# Altium PCB BLDC-Board.PcbDoc (part 4 of 7)
Units mm, origin at the board's own origin, x right, y up, seen from the top; angles counter-clockwise.
Board outline 150 x 117 mm, 4 copper layers (Top Layer, Layer 1, Layer 2, Bottom Layer), stack 1.566 mm thick; 307 components, 221 nets, 983 pads, 534 vias.
Unrouted connection lines stored in the file: 337.
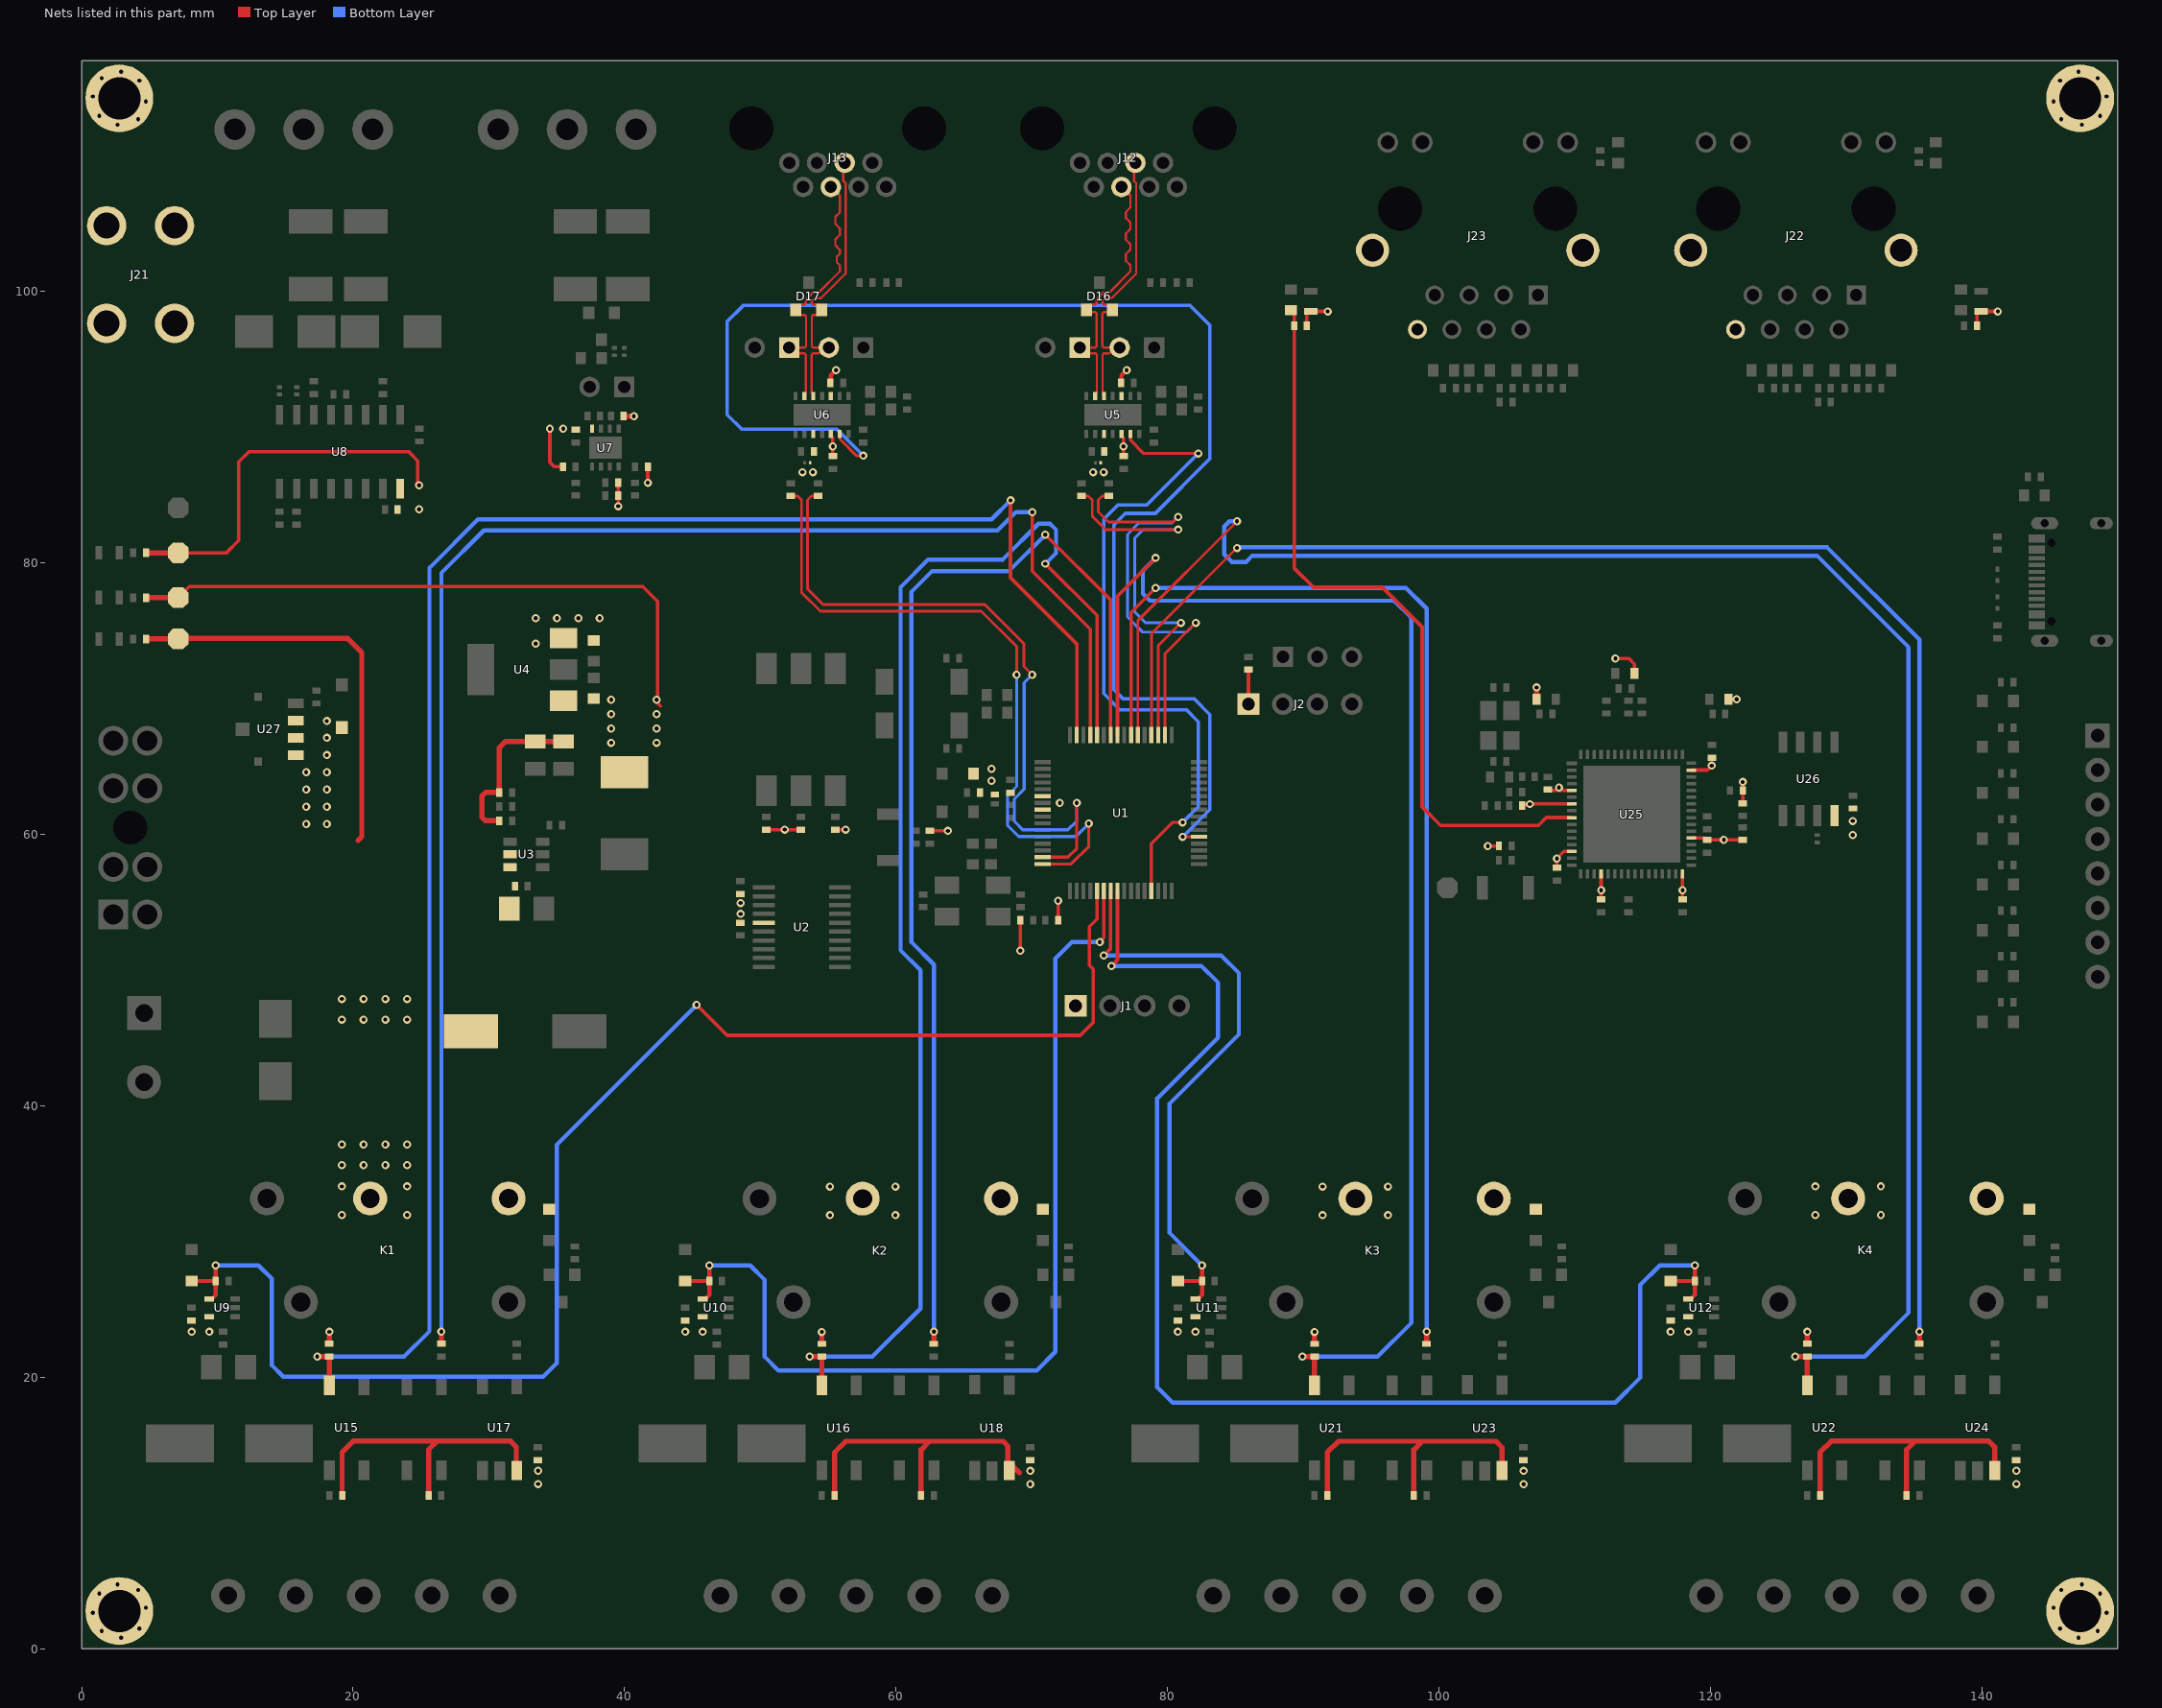
[diagram p4: the nets of this part, all layers, seen from the top]

## Part data (continued)
R25: library part RT0402BRD0730K1L, "RES SMD 30.1KOHM 0.1% 1/16W 0402", LCSC Part Number=C852714, Manufacturer=Yageo, Supplier Part Number=1991324P, Category="Chip SMD Resistors", ComponentLink1Description=https://datasheet.ciiva.com/12722/pyu-rt-1-to-0-05-rohs-l-4-12722119.pdf?src-supplier=Mouser, ComponentLink1URL=https://datasheet.ciiva.com/12722/pyu-rt-1-to-0-05-rohs-l-4-12722119.pdf?src-supplier=Mouser, ComponentLink2Description=https://datasheet.ciiva.com/2582/pyu-rt-1-to-0-05-rohs-l-5-2582303.pdf?src-supplier=Digi-Key, ComponentLink2URL=https://datasheet.ciiva.com/2582/pyu-rt-1-to-0-05-rohs-l-5-2582303.pdf?src-supplier=Digi-Key, Item Type=Resistor, Manufacturer Part Number=RT0402BRD0730K1L, Pricing="100=0.138, 250=0.115, 500=0.092, 1000=0.076 (GBP)", RoHS=Yes, Stock=7420, Supplier=Rs
R26: library part RC0402FR-073K9L, "RES 3.9K OHM 1% 1/16W 0402", Case Code (Imperial)=0402, Case Code (Metric)=1005, LCSC Part Number=C131467, Manufacturer=Yageo, Max Operating Temperature=155°C, Max Power Dissipation=63mW, Min Operating Temperature=-55°C, Power Rating=62.5mW, Resistance Tolerance=1%, Resistor Type="Thick Film", Supplier Part Number=9808155, Temperature Coefficient=100ppm/°C, Voltage Rating=50V, Case/Package=0402, Category="Chip SMD Resistors", ComponentLink1Description=https://datasheet.ciiva.com/12666/pyu-rc0402-51-rohs-l-6-r-12666997.pdf?src-supplier=Mouser, ComponentLink1URL=https://datasheet.ciiva.com/12666/pyu-rc0402-51-rohs-l-6-r-12666997.pdf?src-supplier=Mouser, ComponentLink2Description=https://datasheet.ciiva.com/7849/1018594-7849989.pdf?src-supplier=Element14, ComponentLink2URL=https://datasheet.ciiva.com/7849/1018594-7849989.pdf?src-supplier=Element14, ComponentLink3Description=https://datasheet.ciiva.com/7849/1018594-7849990.pdf?src-supplier=Element14, ComponentLink3URL=https://datasheet.ciiva.com/7849/1018594-7849990.pdf?src-supplier=Element14, ComponentLink4Description=https://datasheet.ciiva.com/15189/getdatasheetpartid-469246-15189453.pdf?src-supplier=Verical, ComponentLink4URL=https://datasheet.ciiva.com/15189/getdatasheetpartid-469246-15189453.pdf?src-supplier=Verical, Construction=Rectangular, Depth=0.5mm, Features="Moisture Resistant", Item Type=Resistor, Lead Free="Lead Free", Length=1mm, Manufacturer Part Number=RC0402FR-073K9L, Military Standard=Not, Number of Terminations=2, Packaging="Tape and Reel", Pricing="10000=0.0011, 100000=0.0011, 300000=0.001, 750000=0.001, 2000000=0.0009 (USD)", Reach SVHC Compliant=Unknown, RoHS=Yes, RoHS Compliant=Yes, Series=RC, Stock=6910000, Supplier="Future Electronics", Termination=SMD/SMT, Tolerance=1%, Voltage Rating (AC)=50V
R27 R82 R83 R92 R93: library part RC0402FR-07470RL, "RES 470 OHM 1% 1/16W 0402", Case Code (Imperial)=0402, Case Code (Metric)=1005, LCSC Part Number=C114877, Manufacturer=Yageo, Max Operating Temperature=155°C, Max Power Dissipation=63mW, Min Operating Temperature=-55°C, Package Quantity=1, Power Rating=62.5mW, Resistance Tolerance=1%, Resistor Type="Thick Film", Temperature Coefficient=100ppm/°C, Voltage Rating=50V, Case/Package=0402, ComponentLink1Description=https://datasheet.ciiva.com/46412/1018594-46412838.pdf?src-supplier=Element14, ComponentLink1URL=https://datasheet.ciiva.com/46412/1018594-46412838.pdf?src-supplier=Element14, ComponentLink2Description=https://datasheet.ciiva.com/2453/pyu-r-int-thick-7-2453377.pdf?src-supplier=Digikey, ComponentLink2URL=https://datasheet.ciiva.com/2453/pyu-r-int-thick-7-2453377.pdf?src-supplier=Digikey, ComponentLink3Description=https://datasheet.ciiva.com/2453/pyu-r-int-thick-7-2453378.pdf?src-supplier=Digikey, ComponentLink3URL=https://datasheet.ciiva.com/2453/pyu-r-int-thick-7-2453378.pdf?src-supplier=Digikey, ComponentLink4Description=https://datasheet.ciiva.com/2453/pyu-r-int-thick-7-2453376.pdf?src-supplier=Digikey, ComponentLink4URL=https://datasheet.ciiva.com/2453/pyu-r-int-thick-7-2453376.pdf?src-supplier=Digikey, ComponentLink5Description=https://datasheet.ciiva.com/7850/1018594-7850015.pdf?src-supplier=Element14, ComponentLink5URL=https://datasheet.ciiva.com/7850/1018594-7850015.pdf?src-supplier=Element14, ComponentLink6Description=https://datasheet.ciiva.com/7850/1018594-7850014.pdf?src-supplier=Element14, ComponentLink6URL=https://datasheet.ciiva.com/7850/1018594-7850014.pdf?src-supplier=Element14, ComponentLink7Description=https://datasheet.ciiva.com/15189/getdatasheetpartid-330246-15189463.pdf?src-supplier=Verical, ComponentLink7URL=https://datasheet.ciiva.com/15189/getdatasheetpartid-330246-15189463.pdf?src-supplier=Verical, Construction=Rectangular, Depth=0.5mm, Features="Moisture Resistant", Height=0.016inch, Item Type=Resistor, Lead Free="Lead Free", Length=1mm, Manufacturer Part Number=RC0402FR-07470RL, Military Standard=Not, Number of Terminations=2, Packaging="Tape and Reel", Pricing="10000=0.00085 (USD)", Reach SVHC Compliant=No, RoHS=Yes, RoHS Compliant=Yes, Series=RC, Stock=10000, Supplier=Avnet, Supplier Part Number=RC0402FR-07470RL, Termination=SMD/SMT, Tolerance=1%, Voltage Rating (AC)=50V, Width=0.02inch, Working Voltage=50V
R28: library part RC0402FR-07200RL, "RES 200 OHM 1% 1/16W 0402", Case Code (Imperial)=0402, Case Code (Metric)=1005, LCSC Part Number=C114764, Manufacturer=Yageo, Max Operating Temperature=155°C, Max Power Dissipation=63mW, Min Operating Temperature=-55°C, Package Quantity=1, Resistance Tolerance=1%, Resistor Type="Thick Film", Supplier Part Number 1=311-200LRCT-ND, Temperature Coefficient=100ppm/°C, Voltage Rating=50V, Case/Package=0402, Category="Chip SMD Resistors", ComponentLink1Description=https://datasheet.ciiva.com/2553/pyu-r-int-thick-7-2553232.pdf?src-supplier=Digi-Key, ComponentLink1URL=https://datasheet.ciiva.com/2553/pyu-r-int-thick-7-2553232.pdf?src-supplier=Digi-Key, ComponentLink2Description=https://datasheet.ciiva.com/7983/1018594-7983509.pdf?src-supplier=Element14, ComponentLink2URL=https://datasheet.ciiva.com/7983/1018594-7983509.pdf?src-supplier=Element14, ComponentLink3Description=https://datasheet.ciiva.com/16804/pyu-rc0402-51-rohs-l-6-r-16804406.pdf?src-supplier=Future+Electronics, ComponentLink3URL=https://datasheet.ciiva.com/16804/pyu-rc0402-51-rohs-l-6-r-16804406.pdf?src-supplier=Future+Electronics, ComponentLink4Description=https://datasheet.ciiva.com/15189/getdatasheetpartid-331152-15189383.pdf?src-supplier=Verical, ComponentLink4URL=https://datasheet.ciiva.com/15189/getdatasheetpartid-331152-15189383.pdf?src-supplier=Verical, ComponentLink5Description=https://datasheet.ciiva.com/7849/1018594-7849898.pdf?src-supplier=Element14, ComponentLink5URL=https://datasheet.ciiva.com/7849/1018594-7849898.pdf?src-supplier=Element14, ComponentLink6Description=https://datasheet.ciiva.com/5562/pyu-rc0402-51-rohs-l-6-r-8721-5562539.pdf?src-supplier=Mouser, ComponentLink6URL=https://datasheet.ciiva.com/5562/pyu-rc0402-51-rohs-l-6-r-8721-5562539.pdf?src-supplier=Mouser, ComponentLink7Description=https://datasheet.ciiva.com/7849/1018594-7849899.pdf?src-supplier=Element14, ComponentLink7URL=https://datasheet.ciiva.com/7849/1018594-7849899.pdf?src-supplier=Element14, ComponentLink8Description=https://datasheet.ciiva.com/2553/pyu-r-int-thick-7-2553230.pdf?src-supplier=Digi-Key, ComponentLink8URL=https://datasheet.ciiva.com/2553/pyu-r-int-thick-7-2553230.pdf?src-supplier=Digi-Key, ComponentLink9Description=https://datasheet.ciiva.com/2553/pyu-r-int-thick-7-2553231.pdf?src-supplier=Digi-Key, ComponentLink9URL=https://datasheet.ciiva.com/2553/pyu-r-int-thick-7-2553231.pdf?src-supplier=Digi-Key, Construction=Rectangular, Depth=0.5mm, Features="Moisture Resistant", Height=0.016inch, Lead Free="Lead Free", Length=1mm, Manufacturer Part Number=RC0402FR-07200RL, Military Standard=Not, Number of Terminations=2, Packaging="Tape and Reel", Power Rating=63mW, Pricing 1="1=0.10000, 10=0.01600, 100=0.00660, 1000=0.00299, 2500=0.00259, 5000=0.00214 (USD)", REACH SVHC="No SVHC", Resistance=200R, RoHS=Yes, RoHS Compliant=Yes, Series=RC, Size Code=0402, Stock 1=19778, Supplier 1=Digi-Key, Termination=SMD/SMT, Tolerance=1%, Voltage Rating (DC)=50V, Width=0.02inch
R29 R30 R122: library part RC0402FR-07100KL, "RES 100K OHM 1% 1/16W 0402", Case Code (Imperial)=0402, Case Code (Metric)=1005, LCSC Part Number=C60491, Manufacturer=Yageo, Max Operating Temperature=155°C, Max Power Dissipation=63mW, Min Operating Temperature=-55°C, Package Quantity=1, Resistance=100kR, Resistance Tolerance=1%, Resistor Type="Thick Film", Supplier Part Number 1=603-RC0402FR-07100KL, Temperature Coefficient=100ppm/°C, Voltage Rating=50V, Case/Package=0402, Category="Chip SMD Resistors", ComponentLink1Description=https://datasheet.ciiva.com/11819/0900766b80c66297-11819452.pdf?src-supplier=RSComponents, ComponentLink1URL=https://datasheet.ciiva.com/11819/0900766b80c66297-11819452.pdf?src-supplier=RSComponents, ComponentLink2Description=https://datasheet.ciiva.com/22747/1018594-22747509.pdf?src-supplier=Element14, ComponentLink2URL=https://datasheet.ciiva.com/22747/1018594-22747509.pdf?src-supplier=Element14, ComponentLink3Description=https://datasheet.ciiva.com/2453/pyu-r-int-thick-7-2453362.pdf?src-supplier=Digi-Key, ComponentLink3URL=https://datasheet.ciiva.com/2453/pyu-r-int-thick-7-2453362.pdf?src-supplier=Digi-Key, ComponentLink4Description=https://datasheet.ciiva.com/2453/pyu-r-int-thick-7-2453363.pdf?src-supplier=Digi-Key, ComponentLink4URL=https://datasheet.ciiva.com/2453/pyu-r-int-thick-7-2453363.pdf?src-supplier=Digi-Key, ComponentLink5Description=https://datasheet.ciiva.com/2453/pyu-r-int-thick-7-2453361.pdf?src-supplier=Digi-Key, ComponentLink5URL=https://datasheet.ciiva.com/2453/pyu-r-int-thick-7-2453361.pdf?src-supplier=Digi-Key, ComponentLink6Description=https://datasheet.ciiva.com/12667/pyu-rc0402-51-rohs-l-6-r-12667930.pdf?src-supplier=Mouser, ComponentLink6URL=https://datasheet.ciiva.com/12667/pyu-rc0402-51-rohs-l-6-r-12667930.pdf?src-supplier=Mouser, ComponentLink7Description=https://datasheet.ciiva.com/15189/getdatasheetpartid-323696-15189334.pdf?src-supplier=Verical, ComponentLink7URL=https://datasheet.ciiva.com/15189/getdatasheetpartid-323696-15189334.pdf?src-supplier=Verical, Construction=Rectangular, Depth=0.5mm, Features="Moisture Resistant", Height=0.016inch, Item Type=Resistor, Lead Free="Lead Free", Length=0.039inch, Manufacturer Part Number=RC0402FR-07100KL, Military Standard=Not, Number of Terminations=2, Packaging="Tape and Reel", Power Rating=63mW, Pricing 1="1=0.10000, 10=0.01200, 50=0.01200, 100=0.00500, 1000=0.00300, 2500=0.00200, 10000=0.00100 (USD)", REACH SVHC="No SVHC", RoHS=Yes, RoHS Compliant=Yes, Series=RC, Stock 1=7759549, Supplier 1=Mouser, Technology="THICK FILM", Termination=SMD/SMT, Tolerance=1%, Width=0.02inch, Working Voltage=50V
R31 R32: library part RC0402FR-0733KL, "RES 33K OHM 1% 1/16W 0402", LCSC Part Number=C138003, Manufacturer=YAGEO, Package=0402, ComponentLink1Description=LCSC, ComponentLink1URL=https://www.lcsc.com/product-detail/Chip-Resistor-Surface-Mount_YAGEO-RC0402FR-0733KL_C138003.html, Item Type=Resistor, Manufacturer Part Number=RC0402FR-0733KL
R33 R34 R35 R36 R41 R42 R43 R44 R45 R46 R58 R59: library part RC0402FR-070RL, "RES 0 OHM JUMPER 1/16W 0402", Case Code (Imperial)=0402, Case Code (Metric)=1005, LCSC Part Number=C106231, Manufacturer=Yageo, Max Operating Temperature=155°C, Max Power Dissipation=63mW, Min Operating Temperature=-55°C, Power Rating=62.5mW, Resistor Type="Thick Film", Supplier Part Number 1=603-RC0402FR-070RL, Temperature Coefficient=200ppm/°C, Tolerance=1%, Voltage Rating=50V, Case/Package=0402, ComponentLink1Description=https://datasheet.ciiva.com/8896/pyu-rc0402-51-rohs-l-6-8896149.pdf?src-supplier=Avnet, ComponentLink1URL=https://datasheet.ciiva.com/8896/pyu-rc0402-51-rohs-l-6-8896149.pdf?src-supplier=Avnet, ComponentLink2Description=https://datasheet.ciiva.com/16790/pyu-rc0402-51-rohs-l-6-r-16790444.pdf?src-supplier=Future+Electronics, ComponentLink2URL=https://datasheet.ciiva.com/16790/pyu-rc0402-51-rohs-l-6-r-16790444.pdf?src-supplier=Future+Electronics, Contact Plating=Tin,Matte, Features="Moisture Resistant", Height=0.35mm, Item Type=Resistors, Lead Free="Lead Free", Length=1mm, Manufacturer Part Number=RC0402FR-070RL, Mount="Surface Mount", Number of Terminations=2, Packaging="Tape and Reel", Pricing 1="1=0.10000, 10=0.01400, 50=0.01400, 100=0.00600, 1000=0.00300, 5000=0.00200, 10000=0.00100 (USD)", Radiation Hardening=No, Resistance=0R, RoHS=Yes, RoHS Compliant=Yes, Series=RC, Size Code=0402, Stock 1=8556842, Supplier 1=Mouser, Termination=SMD/SMT, Width=0.5mm
R37 R38 R39 R40: library part RTT0360R4FTP, "100mW Thick Film Resistors ±100ppm/℃ ±1% 60.4Ω 0603 Chip Resistor - Surface Mount ROHS", LCSC Part Number=C103744, Package=0603, ComponentLink1Description=LCSC, ComponentLink1URL=https://www.lcsc.com/product-detail/Chip-Resistor-Surface-Mount_RALEC-RTT0360R4FTP_C103744.html, Manuacturer=RALEC, Manufacturer Part Number=RTT0360R4FTP
R53: library part RC0603JR-07120RL, "RES 120 OHM 5% 1/10W 0603", LCSC Part Number=C114681, Manufacturer=Yageo, Supplier Part Number=4045720, Voltage Rating (AC)=50V, Category="Chip SMD Resistors", ComponentLink1Description=https://datasheet.ciiva.com/15189/getdatasheetpartid-326532-15189850.pdf?src-supplier=Verical, ComponentLink1URL=https://datasheet.ciiva.com/15189/getdatasheetpartid-326532-15189850.pdf?src-supplier=Verical, ComponentLink2Description=https://datasheet.ciiva.com/2518/pyu-r-int-thick-7-2518850.pdf?src-supplier=Digi-Key, ComponentLink2URL=https://datasheet.ciiva.com/2518/pyu-r-int-thick-7-2518850.pdf?src-supplier=Digi-Key, ComponentLink3Description=https://datasheet.ciiva.com/2518/pyu-r-int-thick-7-2518851.pdf?src-supplier=Digi-Key, ComponentLink3URL=https://datasheet.ciiva.com/2518/pyu-r-int-thick-7-2518851.pdf?src-supplier=Digi-Key, ComponentLink4Description=https://datasheet.ciiva.com/2518/pyu-r-int-thick-7-2518852.pdf?src-supplier=Digi-Key, ComponentLink4URL=https://datasheet.ciiva.com/2518/pyu-r-int-thick-7-2518852.pdf?src-supplier=Digi-Key, ComponentLink5Description=https://datasheet.ciiva.com/46395/443971-46395070.pdf?src-supplier=Element14, ComponentLink5URL=https://datasheet.ciiva.com/46395/443971-46395070.pdf?src-supplier=Element14, ComponentLink6Description=https://datasheet.ciiva.com/12555/rc0603-272842-12555246.pdf?src-supplier=Mouser, ComponentLink6URL=https://datasheet.ciiva.com/12555/rc0603-272842-12555246.pdf?src-supplier=Mouser, Item Type=Resistor, Manufacturer Part Number=RC0603JR-07120RL, Pricing="5000=0.0015, 75000=0.0015, 250000=0.0014, 750000=0.0013, 2500000=0.0012 (USD)", RoHS=Yes, Stock=570000, Supplier="Future Electronics"
R54 R55 R56 R57: library part RC0201FR-0722RL, "RES 22 OHM 1% 1/20W 0201", LCSC Part Number=C155743, Manufacturer=Yageo, Supplier Part Number=5973409, Category="Chip SMD Resistors", ComponentLink1Description=https://datasheet.ciiva.com/7672/1563626-7672215.pdf?src-supplier=Element14, ComponentLink1URL=https://datasheet.ciiva.com/7672/1563626-7672215.pdf?src-supplier=Element14, Item Type=Resistor, Manufacturer Part Number=RC0201FR-0722RL, Pricing="10000=0.0014, 50000=0.0013, 250000=0.0013, 750000=0.0012, 2000000=0.0011 (USD)", RoHS=Yes, Stock=17980000, Supplier="Future Electronics"
R60 R61 R62 R63: library part LR1206-21R040F4, "1W 40mΩ Surface Mount Current Sensing Resistors ±50ppm/℃ ±1% 1206 Current Sense Resistors/Shunt Resistors ROHS", LCSC Part Number=C2681030, Manufacturer=RALEC, Package=1206, ComponentLink1Description=LCSC, ComponentLink1URL=https://www.lcsc.com/product-detail/Current-Sense-Resistors-Shunt-Resistors_RALEC-LR1206-21R040F4_C2681030.html, Item Type=Resistor, Manufacturer Part Number=LR1206-21R040F4
R64 R65 R66 R67 R72 R73 R74 R75: library part CRCW04021K00FKEDHP, "RES SMD 1K OHM 1% 1/5W 0402", Case Code (Imperial)=0402, Case Code (Metric)=1005, LCSC Part Number=C313354, Manufacturer="Vishay Dale", Max Operating Temperature=155°C, Max Power Dissipation=125mW, Min Operating Temperature=-55°C, Package Quantity=10, Resistance=1kR, Resistance Tolerance=1%, Resistor Type="Thick Film", Supplier Part Number 1=541-1.00KYCT-ND, Temperature Coefficient=100ppm/°C, Voltage Rating=50V, Case/Package=0402, ComponentLink1Description=http://www.farnell.com/datasheets/2339608.pdf?src-supplier=Element14, ComponentLink1URL=http://www.farnell.com/datasheets/2339608.pdf?src-supplier=Element14, ComponentLink2Description=http://www.vishay.com/docs/20043/crcwhpe3.pdf?src-supplier=Digi-Key, ComponentLink2URL=http://www.vishay.com/docs/20043/crcwhpe3.pdf?src-supplier=Digi-Key, ComponentLink3Description=http://www.mouser.com/ds/2/427/crcwhpe3-46056.pdf?src-supplier=Mouser, ComponentLink3URL=http://www.mouser.com/ds/2/427/crcwhpe3-46056.pdf?src-supplier=Mouser, ComponentLink4Description=http://www.vishay.com/docs/20043/crcwhpe3.pdf?src-supplier=Avnet, ComponentLink4URL=http://www.vishay.com/docs/20043/crcwhpe3.pdf?src-supplier=Avnet, ComponentLink5Description=http://www.vishay.com/docs/20043/crcwhpe3.pdf?src-supplier=Future+Electronics, ComponentLink5URL=http://www.vishay.com/docs/20043/crcwhpe3.pdf?src-supplier=Future+Electronics, Construction=Rectangular, Contact Plating=Tin, Depth=0.5mm, Features="Automotive AEC-Q200", Height=0.3mm, Lead Free="Lead Free", Length=1mm, Manufacturer Part Number=CRCW04021K00FKEDHP, Military Standard=Not, Mount="Surface Mount", Number of Pins=2, Number of Terminations=2, Packaging="Tape and Reel", Power Rating=125mW, Pricing 1="1=0.15, 10=0.132, 100=0.0506, 1000=0.02226, 2500=0.01923, 5000=0.0172 (USD)", Radiation Hardening=No, REACH SVHC=Unknown, RoHS Compliant=Yes, Series=CRCW-HP, Size Code=0402, Stock 1=315989, Supplier 1=Digi-Key, Technology="THICK FILM", Termination=SMD/SMT, Tolerance=1%, Voltage Rating (DC)=50V, Weight=2.3E-05oz, Width=0.5mm
R68 R69 R70 R71: library part RC0402FR-0720KL, "RES 20K OHM 1% 1/16W 0402", Case Code (Imperial)=0402, Case Code (Metric)=1005, LCSC Part Number=C93942, Manufacturer=Yageo, Max Operating Temperature=155°C, Max Power Dissipation=63mW, Min Operating Temperature=-55°C, Package Quantity=1, Power Rating=62.5mW, Resistance=20kR, Resistance Tolerance=1%, Resistor Type="Thick Film", Temperature Coefficient=100ppm/°C, Voltage Rating=50V, Case/Package=0402, Category="Chip SMD Resistors", ComponentLink1Description=https://datasheet.ciiva.com/11808/0900766b80c66297-11808454.pdf?src-supplier=RSComponents, ComponentLink1URL=https://datasheet.ciiva.com/11808/0900766b80c66297-11808454.pdf?src-supplier=RSComponents, ComponentLink2Description=https://datasheet.ciiva.com/7983/1018594-7983511.pdf?src-supplier=Element14, ComponentLink2URL=https://datasheet.ciiva.com/7983/1018594-7983511.pdf?src-supplier=Element14, ComponentLink3Description=https://datasheet.ciiva.com/46394/1018594-46394974.pdf?src-supplier=Element14, ComponentLink3URL=https://datasheet.ciiva.com/46394/1018594-46394974.pdf?src-supplier=Element14, ComponentLink4Description=https://datasheet.ciiva.com/2453/pyu-r-int-thick-7-2453494.pdf?src-supplier=Digi-Key, ComponentLink4URL=https://datasheet.ciiva.com/2453/pyu-r-int-thick-7-2453494.pdf?src-supplier=Digi-Key, ComponentLink5Description=https://datasheet.ciiva.com/2453/pyu-r-int-thick-7-2453495.pdf?src-supplier=Digi-Key, ComponentLink5URL=https://datasheet.ciiva.com/2453/pyu-r-int-thick-7-2453495.pdf?src-supplier=Digi-Key, ComponentLink6Description=https://datasheet.ciiva.com/2453/pyu-r-int-thick-7-2453493.pdf?src-supplier=Digi-Key, ComponentLink6URL=https://datasheet.ciiva.com/2453/pyu-r-int-thick-7-2453493.pdf?src-supplier=Digi-Key, ComponentLink7Description=https://datasheet.ciiva.com/12558/pyu-rc0402-51-rohs-l-6-r-8721-12558796.pdf?src-supplier=Mouser, ComponentLink7URL=https://datasheet.ciiva.com/12558/pyu-rc0402-51-rohs-l-6-r-8721-12558796.pdf?src-supplier=Mouser, Construction=Rectangular, Depth=0.5mm, Features="Moisture Resistant", Height=0.016inch, Item Type=Resistor, Lead Free="Lead Free", Length=1mm, Manufacturer Part Number=RC0402FR-0720KL, Military Standard=Not, Number of Pins=2, Number of Terminations=2, Packaging="Tape and Reel", Pricing 1="10000=0.00085 (USD)", Reach SVHC Compliant=Yes, RoHS=Yes, RoHS Compliant=Yes, Series=RC, Size Code=0402, Stock 1=1960708, Supplier 1=Avnet, Supplier Part Number 1=RC0402FR-0720KL, Technology="THICK FILM", Termination=SMD/SMT, Tolerance=1%, Voltage Rating (DC)=50V, Width=0.02inch
R76 R77 R84 R85 R86 R87 R94 R95: library part RC0402FR-07240RL, "RES 240 OHM 1% 1/16W 0402", Case Code (Imperial)=0402, Case Code (Metric)=1005, LCSC Part Number=C114755, Manufacturer=Yageo, Max Operating Temperature=155°C, Max Power Dissipation=63mW, Min Operating Temperature=-55°C, Package Quantity=1, Resistance Tolerance=1%, Resistor Type="Thick Film", Supplier Part Number 1=603-RC0402FR-07240RL, Temperature Coefficient=100ppm/°C, Voltage Rating=50V, Case/Package=0402, ComponentLink1Description=https://datasheet.ciiva.com/7849/1018594-7849915.pdf?src-supplier=Element14, ComponentLink1URL=https://datasheet.ciiva.com/7849/1018594-7849915.pdf?src-supplier=Element14, ComponentLink2Description=https://datasheet.ciiva.com/7849/1018594-7849916.pdf?src-supplier=Element14, ComponentLink2URL=https://datasheet.ciiva.com/7849/1018594-7849916.pdf?src-supplier=Element14, ComponentLink3Description=https://datasheet.ciiva.com/2519/pyu-r-int-thick-7-2519157.pdf?src-supplier=Digi-Key, ComponentLink3URL=https://datasheet.ciiva.com/2519/pyu-r-int-thick-7-2519157.pdf?src-supplier=Digi-Key, ComponentLink4Description=https://datasheet.ciiva.com/2519/pyu-r-int-thick-7-2519158.pdf?src-supplier=Digi-Key, ComponentLink4URL=https://datasheet.ciiva.com/2519/pyu-r-int-thick-7-2519158.pdf?src-supplier=Digi-Key, ComponentLink5Description=https://datasheet.ciiva.com/2519/pyu-r-int-thick-7-2519156.pdf?src-supplier=Digi-Key, ComponentLink5URL=https://datasheet.ciiva.com/2519/pyu-r-int-thick-7-2519156.pdf?src-supplier=Digi-Key, ComponentLink6Description=https://datasheet.ciiva.com/12669/pyu-rc0402-51-rohs-l-6-r-12669689.pdf?src-supplier=Mouser, ComponentLink6URL=https://datasheet.ciiva.com/12669/pyu-rc0402-51-rohs-l-6-r-12669689.pdf?src-supplier=Mouser, ComponentLink7Description=https://datasheet.ciiva.com/17419/pyu-rc0402-51-rohs-l-6-r-17419482.pdf?src-supplier=Future+Electronics, ComponentLink7URL=https://datasheet.ciiva.com/17419/pyu-rc0402-51-rohs-l-6-r-17419482.pdf?src-supplier=Future+Electronics, Construction=Rectangular, Depth=0.5mm, Features="Moisture Resistant", Height=0.016inch, Item Type=Resistors, Lead Free="Lead Free", Length=1mm, Manufacturer Part Number=RC0402FR-07240RL, Military Standard=Not, Number of Terminations=2, Packaging="Tape and Reel", Power Rating=63mW, Pricing 1="1=0.10000, 10=0.01200, 50=0.01200, 100=0.00500, 1000=0.00300, 10000=0.00100 (USD)", REACH SVHC=Unknown, Resistance=240R, RoHS=Yes, RoHS Compliant=Yes, Series=RC, Size Code=0402, Stock 1=1903202, Supplier 1=Mouser, Termination=SMD/SMT, Tolerance=1%, Voltage Rating (DC)=50V, Width=0.02inch
R100: library part RT0402BRD0712K1L, "RES SMD 12.1KOHM 0.1% 1/16W 0402", LCSC Part Number=C281773, Manufacturer=Yageo, Supplier Part Number=2068365, Category="Chip SMD Resistors", ComponentLink1Description=https://datasheet.ciiva.com/12812/pyu-rt-1-to-0-05-rohs-l-4-12812462.pdf?src-supplier=Mouser, ComponentLink1URL=https://datasheet.ciiva.com/12812/pyu-rt-1-to-0-05-rohs-l-4-12812462.pdf?src-supplier=Mouser, Item Type=Resistor, Manufacturer Part Number=RT0402BRD0712K1L, Pricing="10000=0.0245, 20000=0.0217, 30000=0.0237, 50000=0.0233, 100000=0.0228, 200000=0.022 (USD)", RoHS=Yes, Stock=60000, Supplier="Future Electronics"
R103 R104 R105 R106 R108 R109 R110 R111: library part RC0603FR-0749R9L, "RES 49.9 OHM 1% 1/10W 0603", Case Code (Imperial)=0603, Case Code (Metric)=1608, LCSC Part Number=C114625, Manufacturer=Yageo, Max Operating Temperature=155°C, Max Power Dissipation=100mW, Min Operating Temperature=-55°C, Resistance Tolerance=1%, Resistor Type="Thick Film", Temperature Coefficient=100ppm/°C, Voltage Rating=50V, Case/Package=0603, Category="Chip SMD Resistors", ComponentLink1Description=https://datasheet.ciiva.com/11808/0900766b80f96399-11808223.pdf?src-supplier=RSComponents, ComponentLink1URL=https://datasheet.ciiva.com/11808/0900766b80f96399-11808223.pdf?src-supplier=RSComponents, ComponentLink2Description=https://datasheet.ciiva.com/22747/443971-22747527.pdf?src-supplier=Element14, ComponentLink2URL=https://datasheet.ciiva.com/22747/443971-22747527.pdf?src-supplier=Element14, ComponentLink3Description=https://datasheet.ciiva.com/15189/getdatasheetpartid-325421-15189750.pdf?src-supplier=Verical, ComponentLink3URL=https://datasheet.ciiva.com/15189/getdatasheetpartid-325421-15189750.pdf?src-supplier=Verical, Construction=Rectangular, Depth=0.8mm, Features="Moisture Resistant", Height=0.45mm, Item Type=Resistor, Lead Free="Lead Free", Length=1.6mm, Manufacturer Part Number=RC0603FR-0749R9L, Military Standard=Not, Number of Pins=2, Number of Terminations=2, Packaging="Tape and Reel", Power Rating=100mW, Pricing 1="5000=0.00280 (USD)", REACH SVHC="No SVHC", Resistance=49.9R, RoHS=Yes, RoHS Compliant=Yes, Series=RC, Size Code=0603, Stock 1=2075000, Supplier 1="Arrow Electronics", Supplier Part Number 1=RC0603FR-0749R9L, Technology="THICK FILM", Termination=SMD/SMT, Tolerance=1%, Voltage Rating (DC)=50V
R107: library part RC0201FR-0710KL, "RES SMD 10K OHM 1% 1/20W 0201", LCSC Part Number=C106225, Manufacturer=Yageo, Package=0201, ComponentLink7Description=LCSC, ComponentLink7URL=https://www.lcsc.com/product-detail/Chip-Resistor-Surface-Mount_YAGEO-RC0201FR-0710KL_C106225.html, Item Type=Resistor, Manufacturer Part Number=RC0201FR-0710KL
R112 R113: library part AC0402FR-070RL, "RESISTOR 0402 JUMPER ZERO OHM", Case Code (Imperial)=0402, Case Code (Metric)=1005, LCSC Part Number=C226739, Manufacturer=Yageo, Max Operating Temperature=155°C, Min Operating Temperature=-55°C, Power Rating=62.5mW, Supplier Part Number=13-AC0402FR-070RLDKR-ND, Temperature Coefficient=200ppm/°C, Tolerance=1%, Voltage Rating=50V, Case/Package=0402, Category="Chip SMD Resistors", ComponentLink1Description=https://datasheet.ciiva.com/12656/pyu-ac-51-rohs-l-2-12656734.pdf?src-supplier=Mouser, ComponentLink1URL=https://datasheet.ciiva.com/12656/pyu-ac-51-rohs-l-2-12656734.pdf?src-supplier=Mouser, ComponentLink2Description=LCSC, ComponentLink2URL=https://www.lcsc.com/product-detail/Chip-Resistor-Surface-Mount_YAGEO-AC0402FR-070RL_C226739.html, Height=370um, Item Type=Resistor, Manufacturer Part Number=AC0402FR-070RL, Packaging="Tape and Reel", Pricing="1=0.1, 10=0.017, 25=0.0132, 50=0.01, 100=0.0071, 250=0.00568, 500=0.00454, 1000=0.00335, 5000=0.0024 (USD)", RoHS=Yes, Series=AC, Stock=337140, Supplier=Digi-Key, Termination=SMD/SMT
R114 R115 R117 R121: library part RC0603JR-07330RL, "RES  SMD 330R 100 mW 0603", Case Code (Imperial)=0603, Case Code (Metric)=1608, LCSC Part Number=C105879, Manufacturer=Yageo, Max Operating Temperature=155°C, Max Power Dissipation=100mW, Min Operating Temperature=-55°C, Package Quantity=5000, Resistance Tolerance=5%, Resistor Type="Thick Film", Supplier Part Number 1=311-330GRCT-ND, Temperature Coefficient=100ppm/°C, Voltage Rating=50V, Case/Package=0603, Category="Chip SMD Resistors", Construction=Rectangular, Depth=0.8mm, Features="Moisture Resistant", Height=0.45mm, Item Type=Resistor, Lead Free="Lead Free", Length=1.6mm, Manufacturer Part Number=RC0603JR-07330RL, Military Standard=Not, Number of Pins=2, Number of Terminations=2, Packaging="Tape and Reel", Power Rating=100mW, Pricing 1="1=0.10000, 10=0.02000, 100=0.00800, 1000=0.00360, 2500=0.00312 (USD)", REACH SVHC="No SVHC", Resistance=330R, RoHS=Yes, RoHS Compliant=Yes, Series=RC, Size Code=0603, Stock 1=1074593, Supplier 1=Digi-Key, Termination=SMD/SMT, Tolerance=5%, Voltage Rating (DC)=50V, Width=0.8mm
SW1 SW3: "SWITCH TACTILE SPST-NO 0.05A 12V", Contact Current Rating=50mA, Contact Resistance=100mR, Insulation Resistance=100MR, LCSC Part Number=C231329, Manufacturer=Omron, Max Operating Temperature=70°C, Max Voltage Rating (DC)=12V, Min Operating Temperature=-25°C, Operating Force=1.5N, Package Quantity=1, Ratings="Dust Proof,IP40", Supplier Part Number 1=SW1020DKR-ND, Actuator Length=0.4mm, Actuator Type=Standard, ComponentLink1Description=http://www.farnell.com/datasheets/60838.pdf?src-supplier=Farnell, ComponentLink1URL=http://www.farnell.com/datasheets/60838.pdf?src-supplier=Farnell, ComponentLink2Description=http://www.farnell.com/datasheets/60838.pdf?src-supplier=Element14, ComponentLink2URL=http://www.farnell.com/datasheets/60838.pdf?src-supplier=Element14, ComponentLink3Description=https://omronfs.omron.com/en_US/ecb/products/pdf/en-b3u.pdf?src-supplier=Digi-Key, ComponentLink3URL=https://omronfs.omron.com/en_US/ecb/products/pdf/en-b3u.pdf?src-supplier=Digi-Key, ComponentLink4Description=http://www.omron.com/ecb/products/pdf/en-b3u.pdf?src-supplier=Digi-Key, ComponentLink4URL=http://www.omron.com/ecb/products/pdf/en-b3u.pdf?src-supplier=Digi-Key, ComponentLink5Description=https://www.distrelec.biz/Web/Downloads/he/et/B3U_eng_datasheet.pdf?mime=application%2Fpdf&src-supplier=Distrelec, ComponentLink5URL=https://www.distrelec.biz/Web/Downloads/he/et/B3U_eng_datasheet.pdf?mime=application%2Fpdf&src-supplier=Distrelec, ComponentLink6Description=http://www.onlinecomponents.com/productFiles/mf-OM/en-b3u.pdf?src-supplier=Onlinecomponents.com, ComponentLink6URL=http://www.onlinecomponents.com/productFiles/mf-OM/en-b3u.pdf?src-supplier=Onlinecomponents.com, ComponentLink7Description=https://www.verical.com/server-webapp/html/getDatasheet?partID=552554&src-supplier=Verical, ComponentLink7URL=https://www.verical.com/server-webapp/html/getDatasheet?partID=552554&src-supplier=Verical, ComponentLink8Description=http://www.farnell.com/datasheets/1685550.pdf?src-supplier=Element14, ComponentLink8URL=http://www.farnell.com/datasheets/1685550.pdf?src-supplier=Element14, ComponentLink9Description=http://www.farnell.com/datasheets/2610940.pdf?src-supplier=Farnell, ComponentLink9URL=http://www.farnell.com/datasheets/2610940.pdf?src-supplier=Farnell, ComponentLink10Description=https://www.alliedelec.com/m/d/4c8a9ef82804fc3c241a13c1e298fd73.pdf?src-supplier=Allied+Electronics, ComponentLink10URL=https://www.alliedelec.com/m/d/4c8a9ef82804fc3c241a13c1e298fd73.pdf?src-supplier=Allied+Electronics, Contact Material=Silver, Current Rating=50mA, Depth=2.5mm, Electrical Life=200000Cycles, Height=1.2mm, Illumination Type=Non-Illuminated,Illuminated, Item Type=Switch, Lead Free="Lead Free", Length=4mm, Manufacturer Part Number=B3U-1000P, Max Current Rating=50mA, Mechanical Life=200000Cycles, Mount="Surface Mount", Orientation=Straight, Packaging="Tape and Reel", Pricing 1="1=1, 10=0.961, 25=0.9064, 50=0.7976, 100=0.7251, 250=0.68888, 500=0.67074, 1000=0.52571 (USD)", REACH SVHC=Unknown, Stock 1=116454, Supplier 1=Digi-Key, Switch Function=Off-Mom, Switch Travel=0.15mm, Termination=SMD/SMT, Throw Configuration=SPST, Voltage Rating (DC)=12V, Weight=0.000776oz, Width=3mm
SW2: "3 positions SPST Black Flat Toggle, Raised Style SMD-6P,6x7.6mm DIP Switches ROHS", LCSC Part Number=C57453, Manufacturer="DongGuan KINGTEK Industrial Co.,LTD", Package=SMD-6P,6x7.6mm, ComponentLink1Description=LCSC, ComponentLink1URL=https://www.lcsc.com/product-detail/DIP-Switches_DongGuan-KINGTEK-Industrial-Co-LTD-DSIC03LSGET_C57453.html, Item Type="DIP Switches", Manufacturer Part Number=DSIC03LSGET
TP1 TP2 TP3 TP4 TP5: "Test Point ON", Item Type="TEST POINT"
U1: "IC MCU 32BIT 512KB FLASH 64LQFP", LCSC Part Number=C2829307, Manufacturer=STMicroelectronics, Supplier Part Number=4135249, Item Type=Microcontrollers, Manufacturer Part Number=STM32G0B1RET6, Pricing="160=3.74, 320=3.68, 480=3.64, 640=3.62, 800=3.54 (USD)", RoHS=Yes, Stock=320, Supplier="Future Electronics"
U2: "IC XPNDR 100KHZ I2C 20TSSOP", LCSC Part Number=C94361, Manufacturer="Texas Instruments", Supplier Part Number=595-PCF8574APWR, Category="Interface ICs", ComponentLink1Description=https://datasheet.ciiva.com/23785/1534147-23785504.pdf?src-supplier=Newark, ComponentLink1URL=https://datasheet.ciiva.com/23785/1534147-23785504.pdf?src-supplier=Newark, ComponentLink2Description=https://datasheet.ciiva.com/15134/getdatasheetpartid-253002-15134574.pdf?src-supplier=Verical, ComponentLink2URL=https://datasheet.ciiva.com/15134/getdatasheetpartid-253002-15134574.pdf?src-supplier=Verical, ComponentLink3Description=https://datasheet.ciiva.com/3149/pcf8574a-3149721.pdf?src-supplier=Avnet, ComponentLink3URL=https://datasheet.ciiva.com/3149/pcf8574a-3149721.pdf?src-supplier=Avnet, ComponentLink4Description=https://datasheet.ciiva.com/3149/pcf8574a-3149799.pdf?src-supplier=Avnet, ComponentLink4URL=https://datasheet.ciiva.com/3149/pcf8574a-3149799.pdf?src-supplier=Avnet, ComponentLink5Description=https://datasheet.ciiva.com/7747/1768199-7747660.pdf?src-supplier=Element14, ComponentLink5URL=https://datasheet.ciiva.com/7747/1768199-7747660.pdf?src-supplier=Element14, ComponentLink6Description=https://datasheet.ciiva.com/1780/pcf8574a-1780187.pdf?src-supplier=Digi-Key, ComponentLink6URL=https://datasheet.ciiva.com/1780/pcf8574a-1780187.pdf?src-supplier=Digi-Key, ComponentLink7Description=https://datasheet.ciiva.com/1780/pcf8574a-1780188.pdf?src-supplier=Digi-Key, ComponentLink7URL=https://datasheet.ciiva.com/1780/pcf8574a-1780188.pdf?src-supplier=Digi-Key, ComponentLink8Description=https://datasheet.ciiva.com/1780/pcf8574a-1780189.pdf?src-supplier=Digi-Key, ComponentLink8URL=https://datasheet.ciiva.com/1780/pcf8574a-1780189.pdf?src-supplier=Digi-Key, Item Type=IC, Length=6.5mm, Manufacturer Part Number=PCF8574APWR, Pricing="1=1.54, 10=1.38, 50=1.38, 100=1.07, 1000=0.78, 10000=0.707 (USD)", RoHS=Yes, Stock=4215, Supplier=Mouser, Thickness=1mm, Width=4.4mm
U3: "IC REG BUCK ADJ 3A TSOT26", Case/Package=SOT-23-6, LCSC Part Number=C2158012, Manufacturer=Diodes, Max Operating Temperature=85°C, Max Output Voltage=31V, Max Supply Voltage=32V, Min Input Voltage=3.8V, Min Operating Temperature=-40°C, Min Output Voltage=800mV, Output Current=3A, Supplier Part Number=31-AP63300WU-7CT-ND, Switching Frequency=500kHz, Category="Voltage Regulators - Switching", ComponentLink1Description=https://www.diodes.com/assets/Datasheets/AP63300-AP63301.pdf?src-supplier=Digikey, ComponentLink1URL=https://www.diodes.com/assets/Datasheets/AP63300-AP63301.pdf?src-supplier=Digikey, ComponentLink2Description=https://datasheet.octopart.com/AP63300WU-7-Diodes-Inc.-datasheet-149521342.pdf?src-supplier=Future+Electronics, ComponentLink2URL=https://datasheet.octopart.com/AP63300WU-7-Diodes-Inc.-datasheet-149521342.pdf?src-supplier=Future+Electronics, Item Type=IC, Manufacturer Part Number=AP63300WU-7, Mounting Technology="Surface Mount", Number of Outputs=1, Output Configuration=Positive, Output Type=Adjustable, Pricing="1=0.92, 10=0.818, 25=0.7764, 100=0.6379, 250=0.59628, 500=0.52696, 1000=0.41602 (USD)", RoHS=No, RoHS Compliant=Yes, Series=-, Stock=11398, Supplier=Digikey, Synchronous Rectifier=Yes
U4: "70dB@(100Hz) 1.5A Fixed 3.3V~3.3V Positive 6V SOT-223 Linear Voltage Regulators (LDO) ROHS", LCSC Part Number=C401677, Manufacturer="BL(Shanghai Belling)", Package=SOT-223, ComponentLink1Description=LCSC, ComponentLink1URL=https://www.lcsc.com/product-detail/Linear-Voltage-Regulators-LDO_BL-Shanghai-Belling-BL8071CLATR33_C401677.html, Item Type=IC, Manufacturer Part Number=BL8071CLATR33
U5 U6: "IC TRANSCEIVER HALF 1/1 14VSON", LCSC Part Number=C5215823, Manufacturer="Texas Instruments", Supplier Part Number=595-TCAN1463DMTRQ1, Item Type=IC, Manufacturer Part Number=TCAN1463DMTRQ1, Pricing="1=2.47, 10=2.22, 50=2.22, 100=1.78, 1000=1.21, 10000=1.09 (USD)", RoHS=Yes, Stock=20610, Supplier=Mouser
U7: "IC TRANSCEIVER HALF 1/1 8SON", LCSC Part Number=C2878080, Manufacturer="Texas Instruments", Supplier Part Number=296-THVD2450DRBRCT-ND, Height=1mm, Item Type=IC, Length=3mm, Manufacturer Part Number=THVD2450DRBR, Pins=8NUMBER, Pricing="1=4.05, 10=3.639, 25=3.4404, 100=2.9818, 250=2.82892, 500=2.53838, 1000=2.1408 (USD)", RoHS=Yes, Stock=2652, Supplier=Digikey, Thickness=880um, Width=3mm
U8: "250Kbps transceiver 2/2 SOP-16 RS232 ICs ROHS", LCSC Part Number=C2904738, Manufacturer=UMW, Package=SOP-16, ComponentLink1Description=LCSC, ComponentLink1URL=https://www.lcsc.com/product-detail/RS232-ICs_UMW-Youtai-Semiconductor-Co-Ltd-MAX3232ESE_C2904738.html, Item Type=IC, Manufacturer Part Number=MAX3232ESE
U9 U10 U11 U12: "IC CMOS 1 CIRCUIT SC70-5", Input Bias Current=5pA, Input Offset Voltage (Vos)=400uV, LCSC Part Number=C398362, Manufacturer="Texas Instruments", Max Operating Temperature=125°C, Min Operating Temperature=-40°C, Operating Supply Current=60uA, Output Current per Channel=40mA, Supplier Part Number=595-TLV9001IDCKR, ComponentLink1Description=http://www.ti.com/lit/ds/symlink/tlv9001.pdf?src-supplier=Digikey, ComponentLink1URL=http://www.ti.com/lit/ds/symlink/tlv9001.pdf?src-supplier=Digikey, Gain Bandwidth Product=1MHz, Item Type=IC, Manufacturer Part Number=TLV9001IDCKR, Mounting Technology="Surface Mount", Number of Channels=1, Number of Circuits=1, Packaging="Cut Tape", Pricing="1=0.47, 10=0.348, 50=0.348, 100=0.194, 1000=0.146, 10000=0.117 (USD)", RoHS=Yes, RoHS Compliant=Yes, Series=-, Slew Rate=2V/µs, Stock=13115, Supplier=Mouser
U13 U14 U15 U16 U19 U20 U21 U22: "Optoisolator Transistor Output 3750Vrms 1 Channel", Case/Package=SMD/SMT, Collector Emitter Saturation Voltage=200mV, Collector Emitter Voltage (VCEO)=80V, Current Transfer Ratio=600%, Forward Current=50mA, Forward Voltage=1.4V, Isolation Voltage=3.75kV, LCSC Part Number=C84196, Manufacturer=Isocom, Max Operating Temperature=100°C, Min Operating Temperature=-55°C, Power Dissipation=170mW, Reverse Breakdown Voltage=6V, Category=Optocouplers, ComponentLink1Description=https://datasheet.ciiva.com/26895/getdatasheetpartid-624485-26895717.pdf?src-supplier=Verical, ComponentLink1URL=https://datasheet.ciiva.com/26895/getdatasheetpartid-624485-26895717.pdf?src-supplier=Verical, ComponentLink2Description=https://datasheet.ciiva.com/29301/183289-da-01-en-optokoppler-is181-gb-29301106.pdf?src-supplier=Conrad, ComponentLink2URL=https://datasheet.ciiva.com/29301/183289-da-01-en-optokoppler-is181-gb-29301106.pdf?src-supplier=Conrad, Fall Time=18000ns, Item Type=Optocoupler, Lead Free="Lead Free", Manufacturer Part Number=IS181GB, Mount="Surface Mount", Number of Elements=1, Number of Pins=4, Pricing 1="1=0.55080, 10=0.34190, 25=0.33860, 50=0.33530, 100=0.19360, 250=0.19160, 500=0.18960, 1000=0.14750 (USD)", Radiation Hardening=No, Rise Time=18000ns, RoHS=Yes, RoHS Compliant=Yes, Stock 1=2922, Supplier 1="Arrow Electronics", Supplier Part Number 1=IS181GB
U17 U18 U23 U24: "15Mbit/s 80ns 2.7V~5.5V 20kV/us DC SO-5 Logic Output Optoisolators ROHS", LCSC Part Number=C107626, Manufacturer=Toshiba, ComponentLink1Description=https://datasheet.octopart.com/TLP2361%28TPL%2CE%28T-Toshiba-datasheet-62094047.pdf?src-supplier=TME, ComponentLink1URL=https://datasheet.octopart.com/TLP2361%28TPL%2CE%28T-Toshiba-datasheet-62094047.pdf?src-supplier=TME, Item Type=Optoisolator, Manufacturer Part Number=TLP2361(TPL,E(T, Pricing="3000=0.3233, 6000=0.3199, 9000=0.3167, 12000=0.3136, 15000=0.3102, 30000=0.3071 (USD)", RoHS=No, Stock=15000, Supplier="Arrow Electronics"
U25: "2/3-PORT ETHERCAT SLAVE CTLR", Manufacturer=Microchip, Manufacturer Part Number=LAN9253-I/R4X, Supplier Part Number=150-LAN9253-I/R4X-ND, ComponentLink1Description="SVN Datasheet", ComponentLink2Description="Local Datasheet", ComponentLink5Description="Open Footprint 2", ComponentLink6Description="Open Footprint 3", Item Type=IC, Pricing="1=13.43, 25=11.2, 100=10.825 (USD)", Revision=2, RoHS=Yes, Stock=364, Supplier=Digikey
U26: "IC EEPROM 256KBIT I2C 1MHZ 8SOIC", Case/Package=SOIC, Frequency=400kHz, Manufacturer="ON Semiconductor", Max Operating Temperature=85°C, Max Supply Voltage=5.5V, Min Operating Temperature=-40°C, Min Supply Voltage=1.8V, Nominal Supply Current=3mA, Operating Supply Voltage=5V, Package Quantity=1, Supplier Part Number 1=8080199P, Access Time=900ns, Access Time-Max=900ns, Category=EEPROM, ComponentLink1Description=https://datasheet.ciiva.com/8072/1780696-8072142.pdf?src-supplier=Element14, ComponentLink1URL=https://datasheet.ciiva.com/8072/1780696-8072142.pdf?src-supplier=Element14, ComponentLink2Description=https://datasheet.ciiva.com/46391/1792913-46391371.pdf?src-supplier=Element14, ComponentLink2URL=https://datasheet.ciiva.com/46391/1792913-46391371.pdf?src-supplier=Element14, ComponentLink3Description=https://datasheet.ciiva.com/4859/cat24c256-d-105771-4859816.pdf?src-supplier=Mouser, ComponentLink3URL=https://datasheet.ciiva.com/4859/cat24c256-d-105771-4859816.pdf?src-supplier=Mouser, ComponentLink4Description=https://datasheet.ciiva.com/16427/cat24c256-d-16427973.pdf?src-supplier=Future+Electronics, ComponentLink4URL=https://datasheet.ciiva.com/16427/cat24c256-d-16427973.pdf?src-supplier=Future+Electronics, Contact Plating=Gold, Density=256Kb, Halogen Free="Halogen Free", Height=1.5mm, Interface=I2C,Serial,2-Wire, Lead Free="Lead Free", Length=5mm, Manufacturer Part Number=CAT24C256WI-GT3, Max Frequency=400kHz, Memory Size=256Kb, Memory Type=EEPROM, Mount="Surface Mount", Number of Pins=8, Number of Words=32000, Organization=32KX8, Packaging="Tape and Reel", Pricing 1="100=0.19900, 200=0.19400, 500=0.18900, 1000=0.18400 (GBP)", Radiation Hardening=No, REACH SVHC="No SVHC", RoHS=Yes, RoHS Compliant=Yes, Series=-, Stock 1=300, Supplier 1=RSComponents, Supply Current=3mA, Supply Voltage-Nom=5.5V, Width=4mm, Write Cycle Time-Max (tWC)=5ms, Write Protection=YES
U27: "MOSFET P-CH 30V 60A PPAK SO-8", LCSC Part Number=C144873, Manufacturer="Vishay Siliconix", ComponentLink1Description=https://datasheet.ciiva.com/4441/si7145dp-223652-4441979.pdf?src-supplier=Mouser, ComponentLink1URL=https://datasheet.ciiva.com/4441/si7145dp-223652-4441979.pdf?src-supplier=Mouser, ComponentLink2Description=https://datasheet.ciiva.com/6367/si7145dp-6367329.pdf?src-supplier=Digikey, ComponentLink2URL=https://datasheet.ciiva.com/6367/si7145dp-6367329.pdf?src-supplier=Digikey, ComponentLink3Description=https://datasheet.ciiva.com/28599/1913296-28599670.pdf?src-supplier=Element14, ComponentLink3URL=https://datasheet.ciiva.com/28599/1913296-28599670.pdf?src-supplier=Element14, ComponentLink4Description=https://datasheet.ciiva.com/22671/1913296-22671737.pdf?src-supplier=Element14, ComponentLink4URL=https://datasheet.ciiva.com/22671/1913296-22671737.pdf?src-supplier=Element14, Item Type=MOSFET, Manufacturer Part Number=SI7145DP-T1-GE3, Pricing="1=1.84, 10=1.58, 50=1.58, 100=1.32, 1000=1.04, 10000=0.956 (USD)", RoHS=Yes, Stock=108048, Supplier=Mouser
X1: library part "MC-306 32.7680K-A0:ROHS", "32.768kHz 12.5pF ±20ppm MC-306 Crystals ROHS", LCSC Part Number=C2650464, Manufacturer="Seiko Epson", ComponentLink1Description=LCSC, ComponentLink1URL=https://www.lcsc.com/product-detail/Crystals_Seiko-Epson-MC-306-32-7680K-A0-ROHS_C2650464.html, Item Type=Crystal, Manufacturer Part Number="MC-306 32.7680K-A0:ROHS"
X2: library part 5TJ480000XYLBC, "8MHz 18pF ±10ppm SMD5032-4P Crystals ROHS", LCSC Part Number=C2149247, Manufacturer=JYJE, Package=SMD5032-4P, ComponentLink1Description=LCSC, ComponentLink1URL=https://www.lcsc.com/product-detail/Crystals_JYJE-5TJ480000XYLBC_C2149247.html, Item Type=Crystal, Manufacturer Part Number=5TJ480000XYLBC
X3: library part X322525MRB4SI, "25MHz 贴片晶振 18pF ±10ppm ±20ppm SMD3225-4P Crystals ROHS", LCSC Part Number=C70593, Manufacturer=YXC, Item Type=Crystal, Manufacturer Part Number=X322525MRB4SI, RoHS=No, Supplier=LCSC

## Free pads (board coordinates)
  round 5 hole 3.1: MH1(2.777,2.78) MH1(2.777,114.22) MH1(147.223,2.78) MH1(147.223,114.22)

## Via types
v1: diameter 0.6, hole 0.3, Top Layer to Bottom Layer, 534 vias

## Nets (pads, with @x,y where several pads share a name; then routed paths per layer and width w, separated by ;. In a path a pad name is that pad's centre, name@x,y a point inside that pad or via, vN(x,y) a via of type N, cw(c..) or ccw(c..) an arc to the next point about the centre after c; other vN are vias at no path point)
+3V3: C5.2 C6.2 C7.2 C21.2 C23.2 C25.2 C28.2 C33.2 C34.2 C35.2 C36.2 C37.2 C54.2 C56.2 C58.2 C60.2 C62.2 C63.2 C64.2 D2.1 FB1.1 FB2.1 FB3.1 J1.1 J2.1 L1.1 LED4.1 LED5.1 R1.2 R6.2 R7.2 R8.2 R12.2 R21.2 R22.2 R23.2 R28.1 R47.2 R48.2 R49.2 R50.2 R52.1 R78.2 R79.2 R88.2 R89.2 R96.2 R97.2 R98.1 R101.1 R102.1 R116.2 R120.2 TP3.1 U1.6 U1.8 U2.5 U4.3 U5.5 U6.5 U7.8 U8.16 U9.5 U10.5 U11.5 U12.5 U25.5 U25.7 U25.14 U25.20 U25.32 U25.37 U25.47 U26.8 | length 82.5
  Top Layer w0.254: TP3.1@7.112,80.74 10.668,80.74 11.582,81.654 11.582,87.436 12.333,88.186 24.102,88.186 24.765,87.523 v1@24.765,85.819 ; v1(34.493,89.884) 34.493,87.401 34.811,87.084 R47.2@35.455,87.084 ; v1(39.522,84.169) R49.2@39.522,84.955 R48.2@39.522,85.896 ; v1(41.707,85.896) R50.2@41.707,87.084 ; R22.2@50.444,60.344 v1(51.797,60.344) R21.2@52.984,60.344 ; U6.5@55.194,89.497 55.194,89.347 55.339,89.202 v1(55.339,88.565) ; C25.2@55.347,87.865 55.343,87.869 55.343,88.554 v1@55.347,88.558 ; R12.2@55.524,60.344 v1(56.286,60.344) ; R23.2@62.502,60.253 v1(63.816,60.253) ; v1(69.153,51.428) R6.2@69.153,53.667 ; R7.2@71.928,53.667 v1(71.928,55.097) ; U5.5@76.608,89.497 76.608,89.347 76.753,89.202 v1(76.753,88.565) 76.752,88.564 76.752,87.866 C23.2@76.75,87.865 ; J2.1@85.954,69.589 R1.2@85.954,72.129 ; R120.2@90.259,97.453 90.259,98.397 90.382,98.52 LED5.1@90.559,98.52 v1(91.796,98.52) ; v1(103.587,59.137) R102.1@104.407,59.137 ; R98.1@106.109,62.106 106.167,62.165 106.621,62.165 v1(106.68,62.223) ; v1@106.688,62.231 U25.7@109.785,62.231 ; C58.2@108.014,63.291 108.072,63.233 U25.5@109.785,63.231 ; C63.2@108.678,57.537 v1(108.678,58.218) 109.191,58.731 U25.14@109.785,58.731 ; v1@108.832,63.233 U25.5@109.785,63.231 ; U25.5@109.785,63.231 U25.5@109.785,63.231 ; C54.2@111.935,55.204 U25.20@111.935,57.081 ; v1(112.994,72.942) 113.981,72.942 114.394,72.529 FB3.1@114.394,71.85 ; C56.2@117.935,55.204 U25.32@117.935,57.081 ; U25.37@118.585,59.731 119.507,59.731 119.659,59.579 C62.2@119.748,59.579 119.752,59.582 122.361,59.582 R96.2@122.365,59.585 ; U25.47@118.585,64.731 119.754,64.731 120.079,65.056 v1(120.088,65.056) ; FB1.1@121.308,69.942 v1(121.912,69.942) ; R97.2@122.365,62.291 R101.1@122.365,63.231 v1(122.365,63.856) ; R116.2@139.624,97.459 139.624,98.397 139.747,98.52 LED4.1@139.924,98.52 v1(141.161,98.52)
  Top Layer w0.381: R28.1@4.75,80.74 TP3.1@7.112,80.74 ; R78.2@18.25,22.468 v1(18.25,23.349) ; v1@24.765,85.819 v1(24.867,85.717) ; R52.1@39.93,90.801 v1(40.686,90.801) ; R79.2@54.53,22.46 v1(54.53,23.341) ; R88.2@90.827,22.46 v1(90.827,23.341) ; FB2.1@107.178,69.942 v1@107.179,70.818 ; R89.2@127.127,22.468 v1(127.127,23.349)
  other v1: 8.106,23.349 9.403,23.349 44.462,23.349 45.759,23.349 80.759,23.349 82.056,23.349 117.059,23.349 118.356,23.349 48.539,54.131 48.539,54.941 111.935,55.886 117.935,55.886 120.98,59.582 130.48,59.937 130.48,60.979 72.06,62.313 108.832,63.436 67.031,63.932 67.031,64.813 107.18,70.819 33.452,74.043 33.452,75.914 35.022,75.914 36.593,75.914 38.164,75.914 24.867,83.94 35.481,89.884
+5V: C17.2 C18.2 C19.2 C20.2 C22.1 C24.1 C38.2 C39.2 C42.2 C43.2 D14.1 D15.1 L2.2 R24.2 R27.1 R31.1 R32.1 R80.2 R81.2 R82.2 R83.2 R90.2 R91.2 R92.2 R93.2 TP2.1 U4.1 U5.3 U5.10 U6.3 U6.10 U17.6 U18.6 U23.6 U24.6 | length 151.4
  Top Layer w0.254: TP2.1@7.112,77.438 7.925,78.251 41.326,78.251 42.418,77.159 42.418,69.671 42.644,69.445
  Top Layer w0.305: R32.1@55.179,93.387 55.179,93.806 v1(55.572,94.199) ; R31.1@76.593,93.262 76.593,93.806 v1(76.986,94.199)
  Top Layer w0.381: R27.1@4.75,77.438 TP2.1@7.112,77.438 ; R82.2@19.19,11.304 19.19,14.47 20.01,15.291 26.187,15.291 ; R80.2@25.564,11.304 25.564,14.667 26.187,15.291 ; C17.2@30.77,60.998 29.753,60.998 29.504,61.247 29.504,62.833 29.758,63.087 R24.2@30.772,63.087 30.772,66.389 31.229,66.846 C19.2@33.401,66.846 C18.2@35.509,66.846 ; U17.6@32.06,13.133 32.02,13.173 32.02,14.876 31.605,15.291 26.187,15.291 ; R83.2@55.47,11.296 55.47,14.462 56.29,15.283 62.467,15.283 ; R81.2@61.844,11.296 61.844,14.659 62.467,15.283 ; 69.092,12.961 68.232,13.821 68.232,14.935 67.884,15.283 62.467,15.283 ; R92.2@91.766,11.296 91.766,14.462 92.587,15.283 98.764,15.283 ; R90.2@98.14,11.296 98.14,14.659 98.764,15.283 ; U23.6@104.637,13.125 104.637,14.827 104.181,15.283 98.764,15.283 ; R93.2@128.067,11.304 128.067,14.47 128.887,15.291 135.064,15.291 ; R91.2@134.441,11.304 134.441,14.667 135.064,15.291 ; U24.6@140.937,13.133 140.937,14.835 140.481,15.291 135.064,15.291
  other v1: 33.625,12.133 69.875,12.125 106.223,12.125 142.523,12.133 33.625,13.108 69.875,13.1 106.223,13.1 142.523,13.108 39.014,66.742 42.359,66.742 39.014,67.796 42.359,67.796 39.014,68.85 42.359,68.85 39.014,69.905 42.359,69.905 53.094,86.68 53.869,86.68 74.508,86.68 75.283,86.68
+24V: C11.1 C14.2 C15.2 D25.1 D26.1 D27.1 D28.1 D29.2 K1.1 K1.3 K2.1 K2.3 K3.1 K3.3 K4.1 K4.3 R26.1 TP1.1 U3.2 U3.3 U27.1 U27.2 U27.3 | length 30.3
  Top Layer w0.381: R26.1@4.75,74.39 TP1.1@7.112,74.39 7.144,74.422 19.607,74.422 20.64,73.389 20.64,59.816 20.371,59.547